# Altium PCB OFS_2027.PcbDoc
Units mil, origin at the board's own origin, x right, y up, seen from the top; angles counter-clockwise.
Board outline 6000 x 4000 mil, 2 copper layers (Top Layer, Bottom Layer); 65 components, 44 nets, 276 pads, 32 vias.
Unrouted connection lines stored in the file: 95.
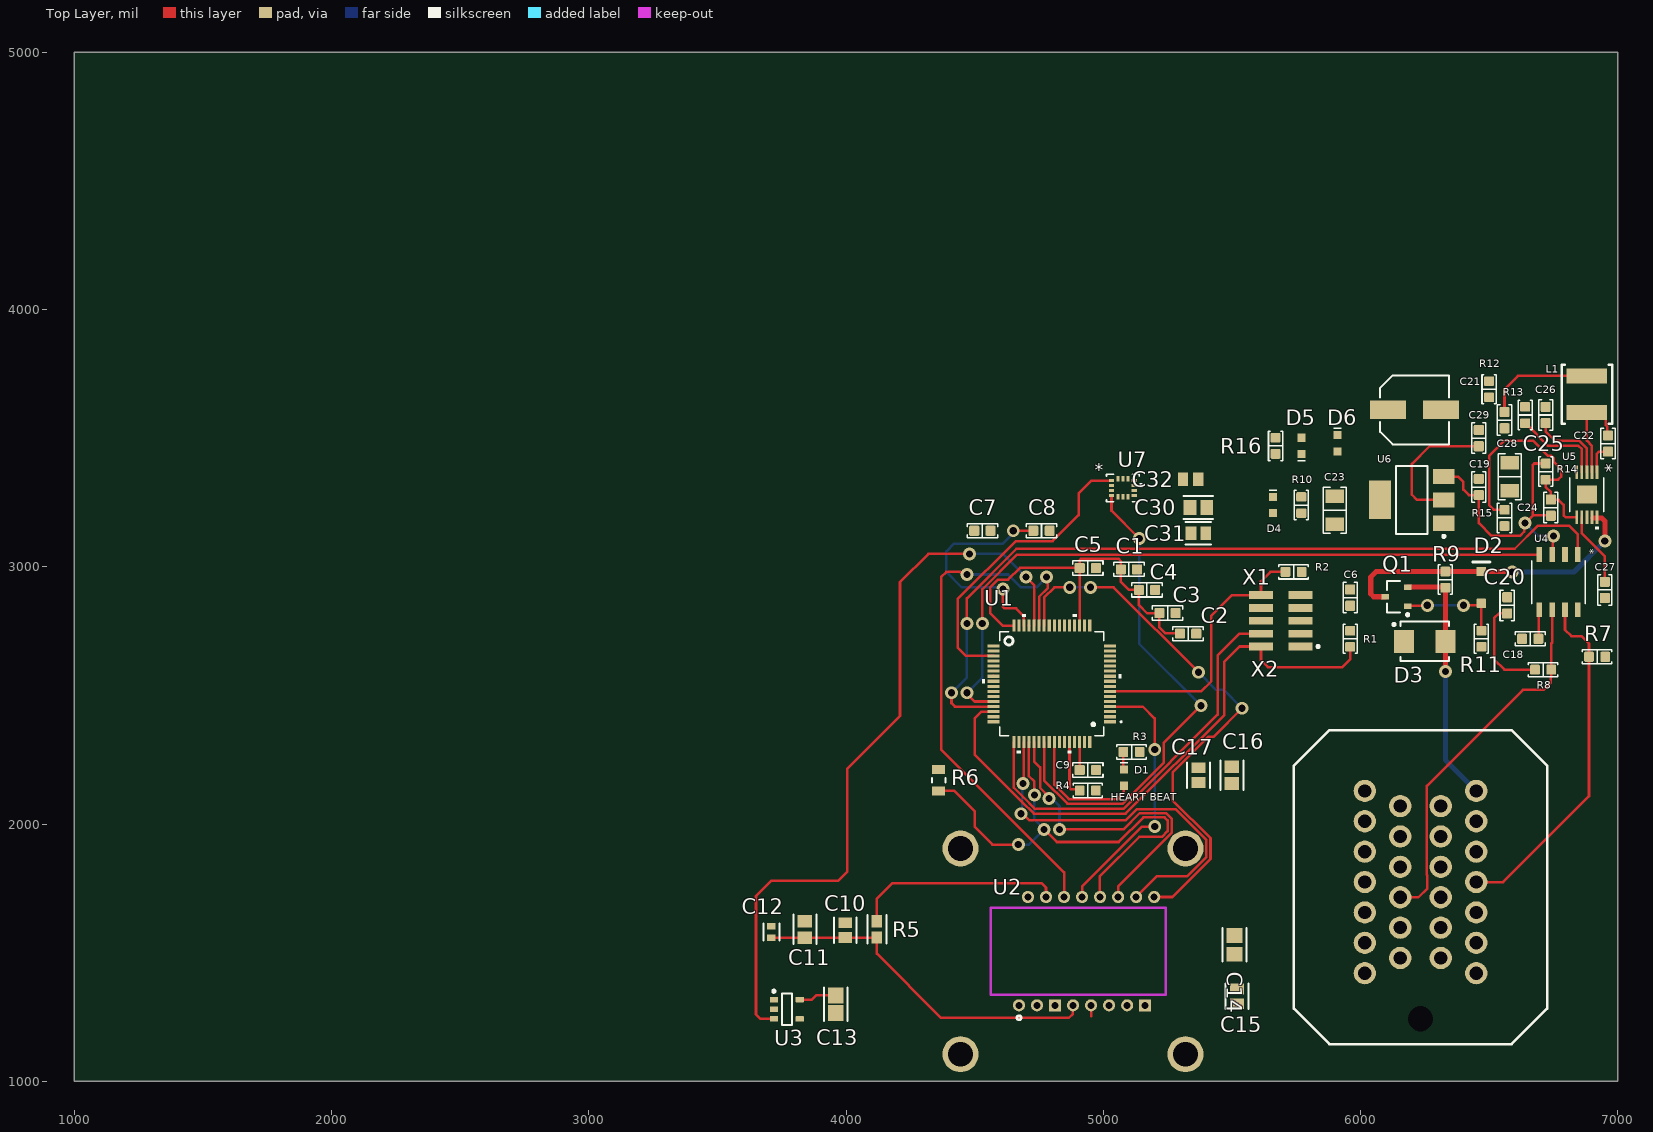
[diagram p0: Top Layer view]
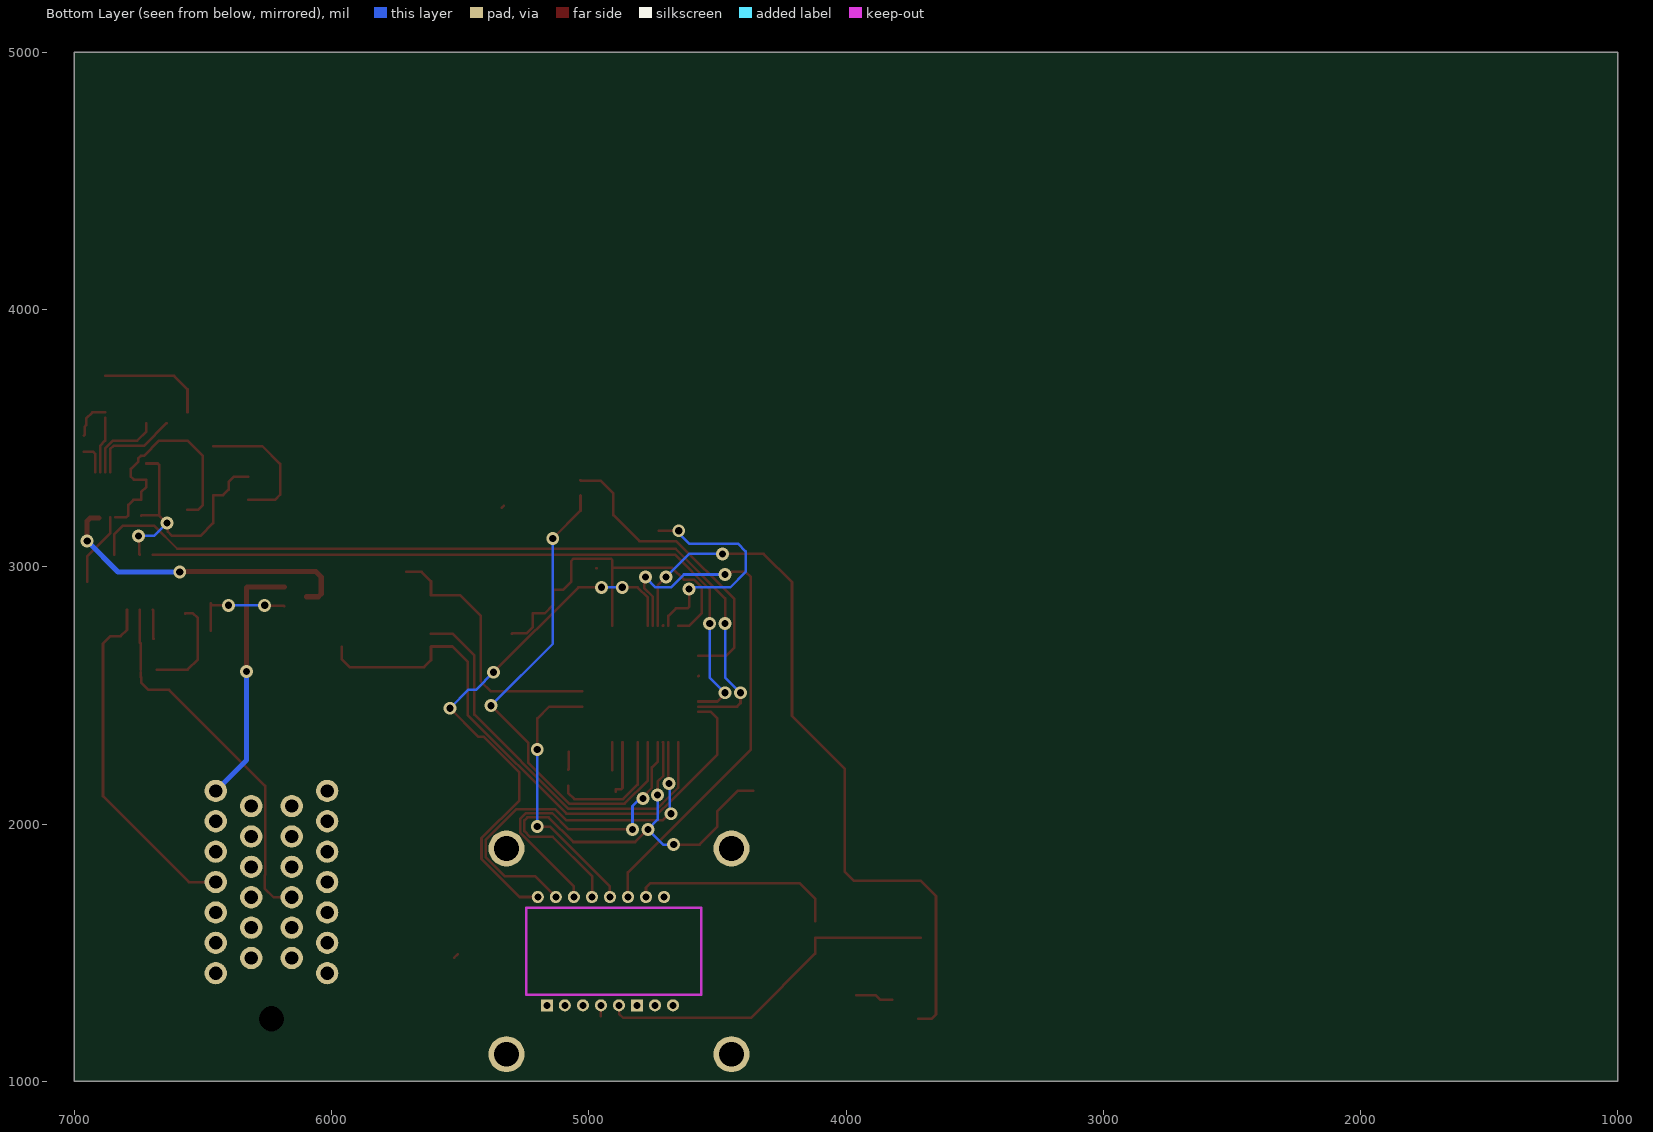
[diagram p1: Bottom Layer view, seen from below]
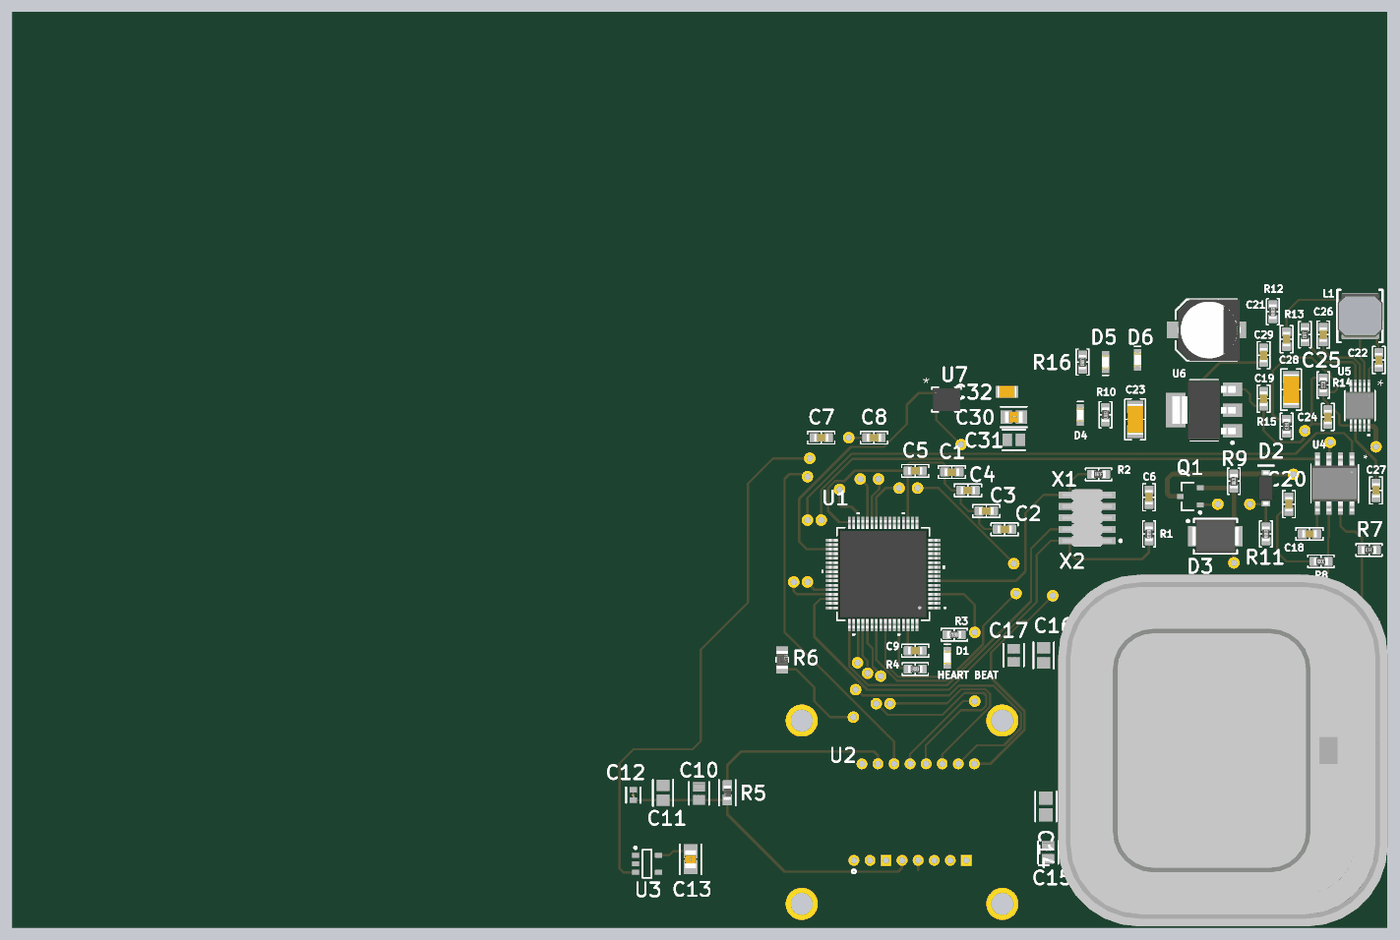
[diagram p2: 3D render of the assembled board from above, using the file's embedded part models]

## Layer stack, top to bottom
Top Solder: solder mask 0.4, Solder Resist, Dk 3.5
Top Layer: signal copper 1.4
Dielectric 1: dielectric 12.6, FR-4, Dk 4.8
Bottom Layer: signal copper 1.4
Bottom Solder: solder mask 0.4, Solder Resist, Dk 3.5

## Board outline
1000,1000 7000,1000 7000,5000 1000,5000

## Design rules (kind name [scope] priority, off if disabled: settings)
Clearance [All] p1: gap=6 ignorepadtopadclearanceinfootprint=FALSE
PolygonConnect [All] p1: connectstyle=Relief reliefconductorwidth=10 reliefentries=4 polygonreliefangle="90 Angle" airgapwidth=10
RoutingVias [All] p1: holewidth=28 width=50 viastyle="Through Hole" minholewidth=28 minwidth=50 maxholewidth=28 maxwidth=50
SolderMaskExpansion [All] p1: expansion=0 istentingtop=FALSE
SupplyNets "Schematic Supply Nets_5" [InNet('3V3')] p1: voltage=0.000
SupplyNets "Schematic Supply Nets_4" [InNet('5V')] p2: voltage=0.000
SupplyNets "Schematic Supply Nets_3" [InNet('GND')] p3: voltage=0.000
SupplyNets "Schematic Supply Nets_1" [InNet('24V')] p4: voltage=0.000
SupplyNets "Schematic Supply Nets" [InNet('+1.9V')] p5: voltage=0.000
Width POWER [InNetClass('POWER')] p1: maxlimit=20 minlimit=20 preferedwidth=20 minimp=50.000000 maximp=50.000000 favimp=50.000000
30 further rules are at their usual default settings.

## Classes and differential pairs
net class POWER: 24V NetD3_2
component class U_POWER: C21 C22 C23 C24 C25 C26 C27 C28 C29 D2 D3 D4 D5 D6 L1 Q1 R9 R10 R11 R12 R13 R14 R15 R16 U5 U6
component class U_OFS: C10 C11 C12 C13 C14 C15 C16 C17 R5 R6 U2 U3
component class U_MCU: C1 C2 C3 C4 C5 C6 C7 C8 C9 D1 R1 R2 R3 R4 U1 X1
component class U_IMU: C30 C31 C32 U7
component class U_CONNECTOR: X2
component class U_CAN_TRANSCEIVER: C18 C19 C20 R7 R8 U4

## Components (designator, comment, footprint, x,y, rotation, side; value= is the part's Value field where it differs from the comment)
C1 "Capacitor" 0603_CAP 5100,2990 r0 top value=4.7u
C2 "Capacitor" 0603_CAP 5330,2740 r0 top value=100n
C3 "Capacitor" 0603_CAP 5250,2820 r0 top value=100n
C4 "Capacitor" 0603_CAP 5170,2910 r0 top value=100n
C5 "Capacitor" 0603_CAP 4940,2995 r0 top value=100n
C6 "Capacitor" 0603_CAP 5960,2880 r90 top value=100n
C7 "Capacitor" 0603_CAP 4530,3140 r180 top value=100n
C8 "Capacitor" 0603_CAP 4760,3140 r0 top value=2.2u
C9 "Capacitor" 0603_CAP 4940,2210 r0 top value=2.2u
C10 "100nF" FP-CL21-IPC_C 3996.78,1587.33 r90 top
C11 "10uF" FP-CL21-IPC_B 3840,1590 r90 top
C12 "1uF" FP-CL10B105KO8NNNC-MFG 3710,1580 r90 top
C13 "33uF" FP-C2012-125-0_2-IPC_A 3960,1300 r270 top
C14 "4.7uF" FP-CL21-IPC_A 5510,1530 r90 top
C15 "100nF" FP-CL21-IPC_C 5520,1330 r90 top
C16 "10uF" FP-CL21-IPC_B 5500,2190 r90 top
C17 "100nF" FP-CL21-IPC_C 5370,2190 r90 top
C18 "Capacitor" 0603_CAP 6660,2720 r0 top value=100n
C19 "Capacitor" 0603_CAP 6460,3310 r270 top value=100n
C20 "Capacitor" 0603_CAP 6570,2850 r90 top value=4.7n
C21 "865080545012" 6.60x6.60x8.00mm_E_CAP 6210,3610 r0 top
C22 "Capacitor" 0603_CAP 6962.23,3478.89 r270 top value=100n
C23 "Capacitor" 1206_CAP 5900,3220 r90 top value=4.7u
C24 "Capacitor" 0603_CAP 6740,3230 r270 top value=10p
C25 "Capacitor" 1206_CAP 6580,3350 r90 top value=22u
C26 "Capacitor" 0603_CAP 6720,3590 r270 top value=1u
C27 "Capacitor" 0603_CAP 6950,2910 r90 top value=10n
C28 "Capacitor" 0603_CAP 6560,3570 r90 top value=10u
C29 "Capacitor" 0603_CAP 6460,3500 r270 top value=22u
C30 "GRM21BD72A225ME01K" FP-GRM21B-0_2-e0_2_0_7-IPC_B 5370,3230 r0 top
C31 "CL21B104KBCNNNC" FP-CL21-IPC_C 5370,3130 r0 top
C32 "CL21B103KBANNNC" CAPC2013X75X45LL10T25 5340,3340 r180 top
D1 "0603_LED" 0603_LED 5080,2180 r270 top
D2 "MMSZ5231B-7-F" SOD-123 6470,2920 r270 top
D3 "SMBJ26CA" SMBJ26CA 6250,2710 r0 top
D4 "0603_LED" 0603_LED 5660,3240 r270 top
D5 "0603_LED" 0603_LED 5770,3470 r90 top
D6 "0603_LED" 0603_LED 5910,3480 r270 top
L1 "SRN5040-150M" SRN5040-150M 6993.94,3548.88 r90 top
Q1 "SSM3J351R,LF" SSM3J351R,LF 6140,2883.4 r180 top
R1 "Resistor" 0603_RES 5960,2720 r270 top value=10k
R2 "Resistor" 0603_RES 5740,2980 r0 top value=10k
R3 "Resistor" 0603_RES 5110,2280 r180 top value=1k
R4 "Resistor" 0603_RES 4940,2130 r180 top value=10k
R5 "5.6Ω" FP-RMCF0603-IPC_A 4120,1590 r270 top
R6 "10K" FP-RMCF0805-MFG 4360,2170 r90 top
R7 "Resistor" 0603_RES 6920,2650 r180 top value=62
R8 "Resistor" 0603_RES 6710,2600 r180 top value=62
R9 "Resistor" 0603_RES 6330,2950 r90 top value=DNP
R10 "Resistor" 0603_RES 5770,3240 r90 top value=22k
R11 "Resistor" 0603_RES 6470,2720 r90 top value=1M
R12 "Resistor" 0603_RES 6500,3690 r90 top value=4.7k
R13 "Resistor" 0603_RES 6640,3590 r270 top value=86.6k
R14 "Resistor" 0603_RES 6720,3370 r270 top value=1M
R15 "Resistor" 0603_RES 6560,3190 r270 top value=123k
R16 "Resistor" 0603_RES 5670,3470 r90 top value=2.2k
U1 "STM32H573RIT6" LQFP64-10x10mm_STM 4800,2545 r180 top
U2 "PAW3395DM-T6QU" PAW3395DM-T6QU 4917.45,1505 r90 top
U3 "TLV70019DDCR" DDC0005A_L 3770,1280 r0 top
U4 "TCAN1057AVDRQ1" SOIC8_D_TEX 6770,2940 r270 top
U5 "LT8609AHMSE#TRPBF" 05-08-1664_ADI 6880,3280 r270 top
U6 "AZ1117CH-3.3TRG1" SOT-233-4 6200,3260 r180 top
U7 "ICM-42688-P" LGA14_2P5X3X0P91_TDK 5076.64,3306.45 r0 top
X1 "20021121-00010C4LF" HDR2X5_SMT 5690,2790 r90 top
X2 "Superseal 26 Pin Straight" SUPERSEAL-26Pin-STR 6233.46,1774.33 r90 top

## Footprints (in the part's own frame and the unit in brackets; to place one, negate y for a bottom-side part, rotate by r counter-clockwise, add the part's x,y. Pads: shape width x height; smd on the part's side, far side on the other; paste and mask are expansions set on the pad)
05-08-1664_ADI [mil]
  rect 52.5x11 smd paste+0 mask+0: 1(-87.25,39.37) 2(-87.25,19.69) 3(-87.25,0) 4(-87.25,-19.69) 5(-87.25,-39.37) 6(87.25,-39.37) 7(87.25,-19.69) 8(87.25,0) 9(87.25,19.69) 10(87.25,39.37)
  rect 70x78 smd paste+0 mask+0: 11(0,0)
  silkscreen extent -66,-66 134,66, body extent -99,-61 99,61, height 43
6.60x6.60x8.00mm_E_CAP [mm] "Aluminum Electrolytic Capacitor, Body 6.60x6.60x8.00mm, IPC Low Density"
  rect 3.55x1.85 smd: 1(-2.625,0) 2(2.625,0)
  silkscreen extent -3.4,-3.4 3.4,3.4, body extent -3.2,-3.4 3.8,3.4, height 8
0603_CAP [mm]
  rrect25% 1x1 smd: 1(-0.8,0) 2(0.8,0)
  silkscreen extent -1.5,-0.7 1.5,0.7, body extent -0.8,-0.41 0.8,0.41, height 0.82
0603_LED [mm] "SMD Mono-color Chip LED, body 1.60 x 0.80 mm"
  rect 0.8x0.8 smd: 1(-0.8,0) 2(0.8,0)
  silkscreen extent -1.55,-0.4 -1.4,0.4, body extent -0.8,-0.4 0.8,0.4, height 0.7
0603_RES [mm] "Chip Resistor, 2-Leads, Body 1.60x0.80mm, IPC Medium Density"
  rrect25% 0.95x1 smd: 1(-0.8,0) 2(0.8,0)
  silkscreen extent -1.45,-0.7 1.45,0.7, body extent -0.8,-0.4 0.8,0.4, height 0.45
1206_CAP [mm]
  rect 1.35x1.8 smd: 1(-1.375,0) 2(1.375,0)
  silkscreen extent -2.27,-1.12 2.27,1.15, body extent -1.7,-0.87 1.7,0.87, height 0.95
CAPC2013X75X45LL10T25 [mm] "Chip Capacitor, 2-Leads, Body 2.1x1.35mm, IPC High Density"
  rect 1x1.3 smd: 1(-0.75,0) 2(0.75,0)
  body extent -1.05,-0.67 1.05,0.67, height 0.75
DDC0005A_L [mm] "SOT23, 5-Leads, Body 3.05x1.75mm, Pitch 0.95mm, IPC High Density"
  rrect18% 0.8x0.55 smd: 1(-1.275,0.95) 2(-1.275,0) 3(-1.275,-0.95) 4(1.275,-0.95) 5(1.275,0.95)
  silkscreen extent -1.4,-1.55 0.5,1.9, body extent -0.88,-1.52 0.87,1.53, height 1.1
FP-C2012-125-0_2-IPC_A [mil]
  rect 62.13x61.27 smd paste+0 mask+0: 1(-34.02,0) 2(34.02,0)
  silkscreen extent -65,-46 65,46, body extent -85,-50 85,50, height 10
FP-CL10B105KO8NNNC-MFG [mm]
  rect 0.625x0.825 smd paste+0 mask+0: 1(-0.575,0) 2(0.575,0)
  silkscreen extent -0.85,-0.8 0.85,0.8, body extent -0.99,-0.55 0.99,0.55, height 0.25
FP-CL21-IPC_A [mil]
  rect 57.27x61.27 smd paste+0 mask+0: 1(-36.45,0) 2(36.45,0)
  silkscreen extent -65,-46 65,46, body extent -85,-50 85,50, height 10
FP-CL21-IPC_B [mil]
  rect 49.4x57.33 smd paste+0 mask+0: 1(-32.51,0) 2(32.51,0)
  silkscreen extent -57,-44 57,44, body extent -67,-39 67,39, height 10
FP-CL21-IPC_C [mil]
  rect 41.52x53.39 smd paste+0 mask+0: 1(-28.57,0) 2(28.57,0)
  silkscreen extent -49,-44 49,44, body extent -53,-32 53,32, height 10
FP-GRM21B-0_2-e0_2_0_7-IPC_B [mil]
  rect 49.4x57.33 smd paste+0 mask+0: 1(-32.51,0) 2(32.51,0)
  silkscreen extent -57,-44 57,44, body extent -67,-39 67,39, height 10
FP-RMCF0603-IPC_A [mil]
  rect 47.48x41.66 smd paste+0 mask+0: 1(-31.54,0) 2(31.54,0)
  silkscreen extent -55,-37 55,37, body extent -75,-41 75,41, height 10
FP-RMCF0805-MFG [mm]
  rect 0.9x1.3 smd paste+0 mask+0: 1(-1.05,0) 2(1.05,0)
  silkscreen extent -0.23,-0.67 0.23,0.67, body extent -1.6,-0.77 1.6,0.77, height 0.25
HDR2X5_SMT [mm] "Header, 10-Leads, Body 3.43x6.35mm, Pitch 1.27mm"
  rect 0.76x2.4 smd: 1(-2.54,-1.95) 2(-2.54,1.95) 3(-1.27,-1.95) 4(-1.27,1.95) 5(0,-1.95) 6(0,1.95) 7(1.27,-1.95) 8(1.27,1.95) 9(2.54,-1.95) 10(2.54,1.95)
  silkscreen extent -2.66,-3.83 -2.42,-3.58, body extent -3.17,-2.75 3.18,2.75, height 4.5
LGA14_2P5X3X0P91_TDK [mil]
  rect 21x12 smd paste+0 mask+0: 1(-44.5,29.53) 2(-44.5,9.84) 3(-44.5,-9.84) 4(-44.5,-29.53) 8(44.5,-29.53) 9(44.5,-9.84) 10(44.5,9.84) 11(44.5,29.53)
  rect 12x21 smd paste+0 mask+0: 5(-19.69,-35) 6(0,-35) 7(19.68,-35) 12(19.68,35) 13(0,35) 14(-19.69,35)
  silkscreen extent -64,-54 75,54, body extent -59,-49 59,49, height 38
LQFP64-10x10mm_STM [mil]
  rect 47x12 smd paste+0 mask+0: 1(-226.38,147.64) 2(-226.38,127.95) 3(-226.38,108.27) 4(-226.38,88.58) 5(-226.38,68.9) 6(-226.38,49.21) 7(-226.38,29.53) 8(-226.38,9.84) 9(-226.38,-9.84) 10(-226.38,-29.53) 11(-226.38,-49.21) 12(-226.38,-68.9) 13(-226.38,-88.58) 14(-226.38,-108.27) 15(-226.38,-127.95) 16(-226.38,-147.64) 33(226.38,-147.64) 34(226.38,-127.95) 35(226.38,-108.27) 36(226.38,-88.58) 37(226.38,-68.9) 38(226.38,-49.21) 39(226.38,-29.53) 40(226.38,-9.84) 41(226.38,9.84) 42(226.38,29.53) 43(226.38,49.21) 44(226.38,68.9) 45(226.38,88.58) 46(226.38,108.27) 47(226.38,127.95) 48(226.38,147.64)
  rect 12x47 smd paste+0 mask+0: 17(-147.64,-226.38) 18(-127.95,-226.38) 19(-108.27,-226.38) 20(-88.58,-226.38) 21(-68.9,-226.38) 22(-49.21,-226.38) 23(-29.53,-226.38) 24(-9.84,-226.38) 25(9.84,-226.38) 26(29.53,-226.38) 27(49.21,-226.38) 28(68.9,-226.38) 29(88.58,-226.38) 30(108.27,-226.38) 31(127.95,-226.38) 32(147.64,-226.38) 49(147.64,226.38) 50(127.95,226.38) 51(108.27,226.38) 52(88.58,226.38) 53(68.9,226.38) 54(49.21,226.38) 55(29.53,226.38) 56(9.84,226.38) 57(-9.84,226.38) 58(-29.53,226.38) 59(-49.21,226.38) 60(-68.9,226.38) 61(-88.58,226.38) 62(-108.27,226.38) 63(-127.95,226.38) 64(-147.64,226.38)
  silkscreen extent -273,-270 270,270, body extent -236,-236 236,236, height 63
PAW3395DM-T6QU [mm] "PixArt PAW3395DM-T6QU optical navigation sensor, 16-pin molded lead-frame DIP, 1.78mm pitch staggered dual row, 10.7mm row spacing, through-hole"
  round 1.2 hole 0.7: 1(-5.334,6.223) 2(-5.334,4.443) 4(-5.334,0.883) 5(-5.334,-0.897) 6(-5.334,-2.677) 7(-5.334,-4.457) 9(5.366,-7.127) 10(5.366,-5.347) 11(5.366,-3.567) 12(5.366,-1.787) 13(5.366,-0.007) 14(5.366,1.773) 15(5.366,3.553) 16(5.366,5.333)
  rect 1.2x1.2 hole 0.7: 3(-5.334,2.663) 8(-5.334,-6.237)
  Keep-Out Layer lines w0.254: -4.284,9.003 -4.284,-8.257 4.316,-8.257 4.316,9.003 -4.284,9.003
  silkscreen extent -6.76,6.02 -6.36,6.42
SMBJ26CA [mm] "SODFL, 2-Leads, Body 3.62x5.40mm, IPC Medium Density"
  rect 1.95x2.25 smd: 1(-2.05,0) 2(2.05,0)
  silkscreen extent -3.17,-1.95 2.4,1.95, body extent -2.67,-1.81 2.67,1.81, height 2.65
SOD-123 [mm] "SODFL, 2-Leads, Body 1.55x3.70mm, IPC Medium Density"
  rrect15% 0.9x0.95 smd: 1(-1.575,0) 2(1.575,0)
  silkscreen extent -2.5,-0.85 -2.5,0.85, body extent -1.85,-0.85 1.85,0.85, height 1.35
SOIC8_D_TEX [mil]
  rect 57.5x22 smd paste+0 mask+0: 1(-107.25,75) 2(-107.25,25) 3(-107.25,-25) 4(-107.25,-75) 5(107.25,-75) 6(107.25,-25) 7(107.25,25) 8(107.25,75)
  silkscreen extent -84,-104 84,104, body extent -122,-99 122,99, height 69
SOT-233-4 [mm] "SOT223, 4-Leads, Body 6.50x7.00mm (avg), Pitch 2.30mm, IPC Medium Density"
  rect 2.15x1.5 smd: 1(-3.15,2.3) 2(-3.15,0) 3(-3.15,-2.3)
  rect 2.15x3.8 smd: 4(3.15,0)
  silkscreen extent -3.27,-3.35 1.55,3.72, body extent -3.5,-3.35 3.5,3.35, height 1.8
SRN5040-150M [mm]
  rect 1.5x4 smd: 1(1.3,2.894) 2(4.9,2.894)
  silkscreen extent 0.2,0.39 6,5.39, body extent 0.6,0.35 5.6,5.37, height 3.5
SSM3J351R,LF [mm]
  rect 0.75x0.55 smd: 1(-1.1,0.95) 2(-1.1,-0.95) 3(1.1,0)
  silkscreen extent -1.23,-1.55 0.95,1.9, body extent -0.95,-1.55 0.95,1.55, height 0.81
SUPERSEAL-26Pin-STR [mm]
  round 2.2 hole 1.3: 1(9,-5.5) 2(6,-5.5) 3(3,-5.5) 4(0,-5.5) 5(-3,-5.5) 6(-6,-5.5) 7(-9,-5.5) 8(7.5,-2) 9(4.5,-2) 10(1.5,-2) 11(-1.5,-2) 12(-4.5,-2) 13(-7.5,-2) 14(7.5,2) 15(4.5,2) 16(1.5,2) 17(-1.5,2) 18(-4.5,2) 19(-7.5,2) 20(9,5.5) 21(6,5.5) 22(3,5.5) 23(0,5.5) 24(-3,5.5) 25(-6,5.5) 26(-9,5.5)
  round 0 hole 2.5: 27(-13.5,0)
  silkscreen extent -16,-12.5 15,12.5, body extent -19.5,-19.5 19.5,17, height 24.71

## Part data
C1 C2 C3 C4 C5 C6 C7 C8 C9 C18 C19 C20 C24 C25 C26 C27 C28 C29: Voltage=25V
C10 C15 C17: library part CMP-2000-05017-2, "CL21 Series 0805 100nF 50V ±10% Tolerance X7R Multilayer Ceramic Chip Capacitor", Case Code (Imperial)=0805, Case Code (Metric)=2012, Dielectric=X7R, Max Operating Temperature=125°C, Min Operating Temperature=-55°C, Tolerance=10%, Voltage=50V, Capacitance=100nF, Case/Package=0805, Contact Plating=Tin, Depth=1.25mm, Height=0.85mm, Lead Free="Lead Free", Length=2mm, Material=Ceramic, Mount="Surface Mount", Packaging="Tape and Reel", Radiation Hardening=No, Thickness=0.037inch, Voltage Rating=50V, Voltage Rating (DC)=50V, Width=0.049inch
C11 C16: library part CMP-13271-001796-1, "CL21 Series 0805 10uF 10V ±10% Tolerance X5R Multilayer Ceramic Chip Capacitor", Case Code (Imperial)=0805, Case Code (Metric)=2012, Dielectric=X5R, Max Operating Temperature=85°C, Min Operating Temperature=-55°C, Package Quantity=3000, Tolerance=10%, Voltage=10V, Capacitance=10uF, Case/Package=0805, Depth=1.25mm, Height=1.25mm, Lead Free="Lead Free", Length=2mm, Mount="Surface Mount", Packaging="Tape and Reel", Radiation Hardening=No, Termination=Wraparound, Thickness=0.053inch, Voltage Rating=10V, Width=0.049inch
C12: library part CMP-2000-06093-2, "CAP CER 1UF 16V X7R 0603", MANUFACTURER="Samsung Electro-Mechanics America, Inc", Manufacturer Part Number=CL10B105KO8NNNC, Temperature="-55°C to +125°C", Temperature Characteristic=X7R, Temperature Coefficient=15%, Temperature Range High=+125°C, Temperature Range Low=-55°C, Tolerance=10%, Voltage Rating=16V, Automotive=No, Capacitance=1uF, Category=Cap, ComponentLink2Description=Datasheet, ComponentLink2URL=http://www.samsungsem.com/global/front/downloadcms.do?path=%2F%2Fglobal%2F%2Fsupport%2F%2Fproduct-search%2F%2Fmlcc%2F%2F__icsFiles%2F%2Fafieldfile%2F%2F2019%2F%2F06%2F%2F18&fileName=CL10B105KO8NNNC-19.pdf, Device Class L1="Passive Components", Device Class L2=Capacitors, Device Class L3="Ceramic Capacitors", Digikey Description="CAP CER 1UF 16V X7R 0603", Height=0.9mm, Ipc Land Pattern Name=CAPC16080X80, Lead Free=Yes, Material=Ceramic, Octopart=https://octopart.com/cl10b105ko8nnnc-samsung-19018973, Package=CL10B105KO8NNNC, RoHS=TRUE
C13: library part CMP-08246-003796-1, "Multilayer Ceramic Capacitors 33μF ±20% 6.3V X5R SMD 0805", Case Code (Imperial)=0805, Case Code (Metric)=2012, Dielectric=X5R, Dielectric Material=Ceramic, Max Operating Temperature=85°C, Min Operating Temperature=-55°C, Package Quantity=1, Tolerance=20%, Voltage Rating=6.3V, Capacitance=33uF, Case/Package=0805, Construction=Flat, Depth=1.25mm, Height=1.25mm, Lead Free="Lead Free", Length=2mm, Mount="Surface Mount", Packaging="Tape and Reel", Radiation Hardening=No, REACH SVHC="No SVHC", Resistor Type=Ceramic, RoHS Compliant=Yes, Series=C, Termination=SMD/SMT, Thickness=0.057inch, Voltage Rating (DC)=6.3V, Weight=0.000194oz, Width=1.2mm
C14: library part CMP-13271-002624-1, "CL21 Series 0805 4.7uF 25V ±10% Tolerance X5R Multilayer Ceramic Chip Capacitor", Case Code (Imperial)=0805, Case Code (Metric)=2012, Dielectric=X5R, Max Operating Temperature=85°C, Min Operating Temperature=-55°C, Package Quantity=1, Tolerance=10%, Voltage Rating=25V, Capacitance=4.7uF, Case/Package=0805, Depth=1.25mm, Height=1.25mm, Lead Free="Lead Free", Length=2mm, Mount="Surface Mount", Packaging="Tape and Reel", Radiation Hardening=No, Thickness=0.055inch, Voltage Rating (DC)=25V, Width=0.049inch
C21: "CAP ALUM 100UF 20% 35V SMD", Voltage=35V, ComponentLink1Description=Digikey, ComponentLink1URL=https://www.digikey.com/en/products/detail/würth-elektronik/865080545012/5728106, Vaule=100u
C22: Voltage=16V
C23: Voltage=50V
C30: library part CMP-06035-063309-1, "CAP CER 2.2UF 100V X7T 0805"
C31: library part CMP-2000-05017-2, "CL21 Series 0805 100nF 50V ±10% Tolerance X7R Multilayer Ceramic Chip Capacitor", Capacitance=100nF, Case Code (Imperial)=0805, Case Code (Metric)=2012, Dielectric=X7R, Max Operating Temperature=125°C, Min Operating Temperature=-55°C, Tolerance=10%, Voltage=50V, Case/Package=0805, Contact Plating=Tin, Depth=1.25mm, Height=0.85mm, Lead Free="Lead Free", Length=2mm, Material=Ceramic, Mount="Surface Mount", Packaging="Tape and Reel", Radiation Hardening=No, Thickness=0.037inch, Voltage Rating=50V, Voltage Rating (DC)=50V, Width=0.049inch
C32: library part CMP-2000-06105-1, "Multilayer Ceramic Capacitor, 10 nF, 50 V, -55 to 125 degC, 2-Pin SMD, RoHS, Tape and Reel", Capacitance=10000pF, Case Size/Dimension=0805, Dielectric=X7R, MANUFACTURER="Samsung Electro-Mechanics", Package Description="2-Pin Surface Mount Device, Body 2 x 1.25 mm", Rated Voltage=50V, Tolerance (%)=±10%, Datasheet URL=https://datasheet.ciiva.com/29199/455082-da-01-en-vs-kondensator-0805-29199459.pdf, Datasheet Version=11/2010, Manufacturer URL=http://www.samsungsem.com/global/index.jsp, Mounting Technology=SurfaceMount, Package Reference=0805
D1 D4 D5 D6: "WL-SMCW Mono-color Chip LED Waterclear, SMT, size 0603, Blue, 3.2V, 140°", Case/Size Code=0603, Emitting Color=Blue, Forward Voltage=3.2V, MANUFACTURER="Wurth Elektronik", Manufacturer Part Number=150060BS75000, Operating Temperature Max=85°C, Operating Temperature Min=-40°C, Category="Signal LEDs", Chip Technology=InGaN, ComponentLink1Description="Website Link", ComponentLink1URL=https://www.we-online.com/redexpert/article/150060BS75000?ad, ComponentLink2Description="Datasheet Link", ComponentLink2URL=https://www.we-online.com/redexpert/spec/150060BS75000?ad, Dominant Wavelength=470nm, Height=0.7mm, Length=1.6mm, Luminous Intensity=145mcd, Match Code=WL-SMCW, Mount="Surface Mount", Packaging="Tape and Reel", Peak Wavelength=465nm, Viewing Angle=140°, Width=0.8mm
D2: "Zener Diode 5.1V 500mW ±5% Surface Mount SOD-123", Package=SOD-123, ComponentLink1Description=Digikey, ComponentLink1URL=https://www.digikey.com/en/products/detail/diodes-incorporated/MMSZ5231B-7-F/755472, Num_Circuits=1
D3: "42.1V Clamp 14.3A Ipp Tvs Diode Surface Mount DO-214AA (SMBJ)", ComponentLink1Description=Digikey, ComponentLink1URL=https://www.digikey.com/en/products/detail/littelfuse-inc/SMBJ26CA/286000
L1: "FIXED IND 15UH 1.8A 96 MOHM SMD"
Q1: "MOSFET P-CH 60V 3.5A SOT-23F"
R5: library part CMP-26527-007122-1, "5.6Ω ±1% 0.1W 0603 Thick Film Chip Resistor AEC-Q200 compliant", Case Code (Imperial)=0603, Case Code (Metric)=1608, Max Operating Temperature=155°C, Max Power Dissipation=100mW, Min Operating Temperature=-55°C, Resistance=5.6R, Resistor Type="Thick Film", Temperature Coefficient=200ppm/°C, Tolerance=1%, Case/Package=0603, Contact Plating=Tin, Features="Automotive AEC-Q200", Height=0.022inch, Length=0.061inch, Mount="Surface Mount", Number of Terminations=2, Packaging="Tape and Reel", Radiation Hardening=No, RoHS Compliant=Yes, Series=RMCF, Width=0.031inch
R6: library part CMP-26527-000121-1, "RES 10K OHM 1% 1/8W 0805", Case Code (Imperial)=0805, Case Code (Metric)=2012, Max Operating Temperature=155°C, Max Power Dissipation=125mW, Min Operating Temperature=-55°C, Resistance=10kR, Resistor Type="Thick Film", Temperature Coefficient=100ppm/°C, Tolerance=1%, Case/Package=0805, Construction=Rectangular, Contact Plating=Tin, Depth=1.25mm, Features="Automotive AEC-Q200", Height=0.026inch, Lead Free="Lead Free", Length=2mm, Military Standard=Not, Mount="Surface Mount", Number of Terminations=2, Packaging="Tape and Reel", Power Rating=125mW, Radiation Hardening=No, RoHS Compliant=Yes, Series=RMCF, Size Code=0805, Width=0.049inch
U1: Mfr_Name=STMicroelectronics, RefDes=RefDes, Type=Type
U2: "PixArt PAW3395DM-T6QU optical navigation sensor, 16-pin molded lead-frame DIP, 1.78mm pitch staggered dual row, 10.7mm row spacing, through-hole"
U3: library part CMP-0394-01054-2, "Single Output LDO, 200 mA, Fixed 1.9 V Output, 2 to 5.5 V Input, with Low IQ, 5-pin SOT (DDC), -40 to 125 degC, Green (RoHS & no Sb/Br)", MANUFACTURER="Texas Instruments", Accuracy(%)=2, Code_JEDEC=MO-193, ComponentLink1Description="Manufacturer URL", ComponentLink1URL=http://www.ti.com/, ComponentLink2Description=Datasheet, ComponentLink2URL=http://www.ti.com/general/docs/lit/getliterature.tsp?genericPartNumber=TLV70019&fileType=pdf, ComponentLink3Description="Package Specification", ComponentLink3URL=http://www.ti.com/litv/pdf/mpds123d, DatasheetVersion=SLVSA00D, Eco-Plan="Green (RoHS & no Sb/Br)", Fixed Output Options(V)=1.9, Iout(Max)(A)=0.2, Iq(Typ)(mA)=0.03, Mounting Technology="Surface Mount", PackageDescription="5-Pin Plastic Small Outline, Body 2.9 x 1.6 mm, 0.95 mm Pitch", PackageReference=DDC0005A, PackageVersion=4204403-2/E, PartNumber=TLV70019DDCR, SubFamily="Single Channel LDO", Vdo(Typ)(mV)=175, Vin(Max)(V)=5.5, Vin(Min)(V)=2, Vout Adj(Max)(V)=1.9, Vout Adj(Min)(V)=1.9
U4: "CAN transceiver with silent mode 8-SOIC Bus Protected", Manufacturer_Name="Texas Instruments", ComponentLink1Description=Datasheet, ComponentLink1URL=https://www.ti.com/lit/ds/symlink/tcan1057a-q1.pdf, Copyright="Copyright (C) 2025 Ultra Librarian. All rights reserved.", Manufacturer_Part_Number=TCAN1057AVDRQ1, RefDes=RefDes, Type=Interface
U5: library part LT8609AHMSETRPBF, "Buck Switching Regulator IC Positive Adjustable 0.782V 1 Output 3A 10-TFSOP, 10-MSOP (0.118\", 3.00mm Width) Exposed Pad", Manufacturer_Name="Analog Devices Inc", Copyright="Copyright (C) 2025 Ultra Librarian. All rights reserved.", Manufacturer_Part_Number=LT8609AHMSE#TRPBF, RefDes=RefDes, Type="Power Management"
U6: "No Description Available", Manufacturer_Name="Diodes Inc", Copyright="Copyright (C) 2025 Ultra Librarian. All rights reserved.", Manufacturer_Part_Number=AZ1117CH-3.3TRG1, RefDes=RefDes, Type=Type
U7: "Description", Manufacturer_Name=TDK, Copyright="Copyright (C) 2025 Ultra Librarian. All rights reserved.", Manufacturer_Part_Number=ICM-42688-P, RefDes=RefDes, Type="Motion Sensors"
X1: "Header, 10-Leads, Body 3.43x6.35mm, Pitch 1.27mm", Circuits=10, ComponentLink1Description=Digikey, ComponentLink1URL=https://www.digikey.com/product-detail/en/amphenol-icc-fci/20021121-00010C4LF/609-3695-1-ND/2209147, Name=20021121-00010C4LF
X2: library part 6437288-6, "Connector Header Through Hole 26 position 0.118\" (3.00mm)"

## Free pads (board coordinates)
  round 140 hole 96: 2(4445,1105) 3(4445,1905) 4(5320,1905) 5(5320,1105)

## Via types
v1: diameter 50, hole 28, Top Layer to Bottom Layer, 32 vias

## Nets (pads, with @x,y where several pads share a name; then routed paths per layer and width w, separated by ;. In a path a pad name is that pad's centre, name@x,y a point inside that pad or via, vN(x,y) a via of type N, cw(c..) or ccw(c..) an arc to the next point about the centre after c; other vN are vias at no path point)
3V3: C1.1 C2.1 C3.1 C4.1 C5.1 C6.1 C7.1 C16.1 C17.1 C18.2 C29.2 C30.1 C31.1 C32.2 R1.1 R2.2 R6.2 R16.2 U1.13 U1.19 U1.32 U1.48 U1.64 U2.7 U3.1 U4.5 U6.2 U6.4 U7.5 U7.8 X1.1 | length 2136.9
  Top Layer w10: U1.32 4608.62,2771.38 4560,2820 4560,2920 4590,2950 4630,2950 4675.75,2995.75 C5.1@4907.76,2995.75 ; U1.19 C5.1@4908.27,2995 ; C5.1 4908.5,3025.39 4914.36,3031.25 5058.75,3031.25 5068.5,3021.5 C1.1 5068.5,2941.5 5100,2910 C4.1 5138.5,2851.5 5170.75,2819.25 C3.1@5217.76,2819.25 ; C3.1 5218.5,2764.12 5241.31,2741.31 5297.19,2741.31 C2.1 ; C30.1@5330.47,3237.02 C30.1 ; U6.2 6220,3260 6200,3280 6200,3400 6268.5,3468.5 C29.2 ; C18.2 6693.25,2721.75 6693.25,2831 U4.5
3V_LED: D6.2 R16.1
5V: C19.2 C24.2 C25.2 C28.2 L1.2 R12.2 R14.1 U4.3 U6.3 | length 1527.5
  Top Layer w10: U6.3 6379.45,3350.55 6400,3330 6400,3300 6421.5,3278.5 C19.2 6460,3170 6510,3120 6620,3120 6636.72,3136.72 6636.72,3166.72 v1(6640,3170) 6670,3200 ; C28.2 6560,3690 6611.79,3741.79 L1.2 ; R14.1 6675.86,3401.5 6670,3395.64 6670,3200 ; C24.2 6738.5,3200 6670,3200 ; U4.3 6747.5,3049.75 6747.5,3117.5 v1(6750,3120)
  Bottom Layer w10: v1(6640,3170) 6690,3120 v1(6750,3120)
5V_LED: D5.2 R12.1
24V: C21.1 C23.2 D2.1 Q1.3 R9.2 R10.2 U5.9 U5.10 | length 1225.1
  Top Layer w20: Q1.3 6051.72,2883.4 6040,2895.11 6040,2960 6061.5,2981.5 R9.2 6330.26,2981.75 6469.74,2981.75 D2.1 6471,2981 6589,2981 v1(6590,2980) ; U5.9@6904.09,3190 6938.28,3190 6950,3178.28 v1(6950,3100)
  Bottom Layer w20: v1(6590,2980) 6830,2980 v1(6950,3100)
24V_LED: D4.2 R10.1
+1.9V: C10.1 C11.1 C12.1 C13.1 R5.2 U2.4 U3.5 | length 1525.1
  Top Layer w10: C12.1 3839.87,1557.36 C11.1 3996.1,1557.49 3997.08,1558.46 R5.2 4120,1496 4370,1246 4866,1246 4882.24,1262.24 4882.24,1294.55 U2.4 ; U3.5 3867.4,1317.4 3884.02,1334.02 C13.1
BOOT0: R4.2 U1.60 | length 216.4
  Top Layer w10: U1.60 4868.9,2140.65 4874.76,2134.79 4894.8,2134.79 R4.2@4894.8,2124.69
BST: C22.2 U5.1 | length 118.3
  Top Layer w10: U5.1 6919.37,3439.37 6927.39,3447.39 C22.2
Feedback: C24.1 R14.2 R15.1 U5.6 | length 948.1
  Top Layer w10: R15.1 6518.5,3221.5 6500,3240 6500,3430 6560,3490 6670,3490 6728.8,3431.2 6741.5,3431.2 6750.69,3422.01 6750.69,3409.31 6780,3380 6780,3350 6768.5,3338.5 R14.2 6720,3310 6740,3290 C24.1 6741.5,3260 6770,3260 6790,3240 6790,3200 6797.25,3192.75 U5.6
GND: C1.2 C2.2 C3.2 C4.2 C5.2 C6.2 C7.2 C8.2 C9.2 C10.2 C11.2 C12.2 C13.2 C14.2 C15.2 C16.2 C17.2 C18.1 C19.1 C20.2 C21.2 C23.1 C25.1 C26.1 C27.1 C28.1 C29.1 C30.2 C31.2 C32.1 D3.1 D4.1 D5.1 D6.1 R3.1 R4.1 R11.1 R13.1 R15.2 U1.12 U1.18 U1.31 U1.47 U1.63 U2.3 U2.8 U3.2 U4.2 U4.8 U5.11 U6.1 U7.6 U7.7 U7.11 X1.3 X1.5 X2.13 | length 2.1
  Top Layer w10: C5.2@4970,2993.5 C5.2
HB_LED: D1.1 R3.2 | length 69.1
  Top Layer w10: R3.2 5078.5,2212.99 D1.1
HEART_BEAT: D1.2 U1.57 | length 497.7
  Top Layer w10: U1.57 4809.84,2152.78 4866.31,2096.31 5056.31,2096.31 5080,2120 D1.2
INTVCC: C26.2 U5.3 | length 313
  Top Layer w10: C26.2 6720,3525.25 6755.25,3490 6850,3490 6880,3460 U5.3
NetC14_1: C14.1 C15.1 U2.5 | length 61.4
  Top Layer w10: 4952.76,1252.76 U2.5 ; C14.1 C14.1@5523.55,1480
NetC22_1: C22.1 L1.1 U5.2 | length 371.7
  Top Layer w10: L1.1@6880,3578.27 6880,3490 6899.69,3470.32 U5.2 ; L1.1 6929.21,3600.06 6953.74,3575.53 6953.74,3550.4 6960,3544.14 6960,3512.61 C22.1
NetD3_2: D3.2 Q1.2 R9.1 X2.1 | length 987.5
  Top Layer w20: Q1.2 6327.71,2920.8 R9.1 6330,2710.71 D3.2 ; v1(6330,2593.4) D3.2@6330,2710
  Bottom Layer w20: v1(6330,2593.4) 6330,2248.66 X2.1
NetR5_1: R5.1 U2.15 | length 814.3
  Top Layer w10: R5.1 4120,1710 4180,1770 4760,1770 4777.57,1752.43 U2.15
NetR6_1: R6.1 U1.52 U2.12 | length 1925.1
  Top Layer w10: R6.1 4421.34,2128.66 4500,2050 4500,1989.59 4569.59,1920 v1(4670,1920) ; U1.52 4710.42,2317.62 4710.42,2186.31 4732.23,2164.51 v1(4732.23,2112.23) ; v1(4770,1979) 4771,1979 4820,1930 5060,1930 5156,2026 5238.14,2026 5250,2014.14 5250,1972.18 5227.82,1950 5140,1950 4986.31,1796.31 4986.31,1717.75 U2.12
  Bottom Layer w10: v1(4670,1920) 4711,1920 v1(4770,1979) 4732.23,2016.77 v1(4732.23,2112.23)
NetR7_2: R7.2 U4.7 X2.4 | length 1363.3
  Top Layer w10: X2.4 6554.33,1774.33 6888.5,2108.5 R7.2 6888.5,2701.5 6860,2730 6820,2730 6795,2755 U4.7
NetR8_1: R8.1 U4.6 X2.17 | length 1441.4
  Top Layer w10: X2.17 6225.28,1715.28 6260,1750 6260,1800 6257.9,1802.1 6257.9,2147.9 6631.5,2521.5 6711.5,2521.5 6740,2550 6740,2570 6741.17,2571.17 R8.1@6741.17,2589.68 ; R8.1 6741.5,2701.5 6745,2705 U4.6
NetU1_4: U1.4 U2.13 | length 1032.8
  Top Layer w10: U2.13 4917.72,1757.72 5150,1990 v1(5200,1990) ; U1.4 5153.58,2456.42 5200,2410 v1(5200,2290)
  Bottom Layer w10: v1(5200,1990) v1(5200,2290)
NetU1_26: U1.26 U2.9 | length 2139.8
  Top Layer w10: U1.26 4770.47,2880.47 4810,2920 v1(4870,2920) ; v1(4950,2920) 5040,2920 v1(5370,2590) ; U2.9 5268.44,1716.26 5417,1864.82 5417,1945.18 5270,2092.18 5270,2200 5409.86,2339.86 5429.86,2339.86 v1(5540,2450)
  Bottom Layer w10: v1(4870,2920) v1(4950,2920) ; v1(5370,2590) 5437.29,2522.71 5467.29,2522.71 v1(5540,2450)
NetU1_27: U1.27 U2.14 | length 2104.6
  Top Layer w10: v1(4470,2970) 4462.35,2977.65 4446.49,2977.65 4444.14,2980 4390,2980 4370,2960 4370,2290 4847.65,1812.35 U2.14 ; U1.27 4750.79,2883.41 4783.52,2916.14 4783.52,2956.23 v1(4780,2959.75)
  Bottom Layer w10: v1(4470,2970) 4630,2970 4680,2920 4740.25,2920 v1(4780,2959.75)
NetU1_28: U1.28 U3.3 | length 2915.5
  Top Layer w10: U3.3 3667.4,1242.6 3650,1260 3650,1720 3710,1780 3970,1780 4004.14,1814.14 4004.14,2214.14 4210,2420 4210,2940 4320,3050 v1(4480,3050) ; v1(4700,2959.75) 4731.1,2928.65 U1.28
  Bottom Layer w10: v1(4480,3050) 4609.75,3050 v1(4700,2959.75)
NetU1_29: U1.29 U7.13 | length 1
  Top Layer w10: U1.29@4710.71,2772.09 U1.29
NetU1_35: U1.35 U7.1 | length 1179.6
  Top Layer w10: U1.35 4466.73,2653.27 4434,2686 4434,2874 4660,3100 4803.54,3100 4904.15,3200.61 4904.15,3284.15 4954.97,3334.97 5031.14,3334.97 U7.1
NetU1_36: U1.36 U7.14
NetU1_39: U1.39 U7.9 | length 1.9
  Top Layer w10: U1.39@4572.31,2575.84 U1.39
NetU1_44: U1.44 U4.4 | length 2768.3
  Top Layer w10: v1(4470,2510) 4470,2505.84 4499.74,2476.1 U1.44 ; v1(4530,2780) 4530,2912.63 4664.62,3047.25 U4.4
  Bottom Layer w10: v1(4470,2510) 4530,2570 v1(4530,2780)
NetU1_45: U1.45 U4.1 | length 3185.8
  Top Layer w10: v1(4410,2510) 4410,2470 4423.58,2456.42 U1.45 ; v1(4470,2780) 4470,2877.37 4662.63,3070 6599.7,3070 6689.7,3160 6810,3160 6845,3125 U4.1
  Bottom Layer w10: v1(4410,2510) 4470,2570 v1(4470,2780)
NetU1_51: U1.51 U2.10 | length 1486.5
  Top Layer w10: v1(4680,2040) 4686.57,2040 4711.57,2015 5087.63,2015 5130.63,2058 5281.55,2058 5401,1938.55 5401,1871.45 5326.97,1797.42 5209.12,1797.42 U2.10 ; v1(4688.36,2157.46) 4690.87,2159.96 4690.87,2317.76 U1.51
  Bottom Layer w10: v1(4680,2040) 4685,2045 4685,2154.1 v1(4688.36,2157.46)
NetU1_53: U1.53 U2.11 | length 1248.5
  Top Layer w10: U1.53 4731.1,2243.38 4754.47,2220.01 4754.47,2140.89 4789.54,2105.82 v1(4789.54,2099.54) ; v1(4830,1979) 4831,1980 5080,1980 5142,2042 5244.77,2042 5266,2020.77 5266,1965.55 5057.88,1757.43 U2.11
  Bottom Layer w10: v1(4789.54,2099.54) 4800.37,2099.54 4830,2069.91 v1(4830,1979)
NetU1_55: U1.55 U7.4 | length 1959.5
  Top Layer w10: U1.55@4770.47,2318.15 4770.47,2169.53 4860.69,2079.31 5076.69,2079.31 5236,2238.63 5236,2316 v1(5380,2460) ; U7.4 5032.14,3217.86 v1(5140,3110)
  Bottom Layer w10: v1(5140,3110) 5140,2700 v1(5380,2460)
NetU1_56: U1.56 U7.12
NRST: R2.1 U1.7 X1.10 | length 1055.1
  Top Layer w10: U1.7 5380.47,2515.47 5420,2555 5420,2810 5500,2890 X1.10 5613.23,2943.23 5650,2980 R2.1
PP_Gate: D2.2 Q1.1 R11.2 | length 398.2
  Top Layer w10: Q1.1 6185.31,2848 6258,2848 v1(6260,2850) ; v1(6400,2850) 6462.01,2850 D2.2 R11.2
  Bottom Layer w10: v1(6260,2850) v1(6400,2850)
RT: R13.2 U5.4 | length 352.1
  Top Layer w10: R13.2 6640.98,3558.5 6729.49,3470 6847.37,3470 6860.31,3457.06 U5.4
SPLIT: C20.1 R7.1 R8.2 | length 393.5
  Top Layer w10: C20.1@6569.25,2817.76 6567.01,2820 6540,2820 6520,2800 6520,2640 6560,2600 R8.2
SWCLK: U1.49 X1.4 | length 1588.5
  Top Layer w10: U1.49 4652.36,2140.93 4689.34,2103.96 4689.58,2103.96 4733.54,2060 5080,2060 5445,2425 5445,2655 5530,2740 X1.4
SWDIO: R1.2 U1.46 X1.2 | length 2295.5
  Top Layer w10: U1.46 4526.73,2436.73 4500,2410 4500,2270.67 4682.71,2087.96 4682.95,2087.96 4730.91,2040 5087.37,2040 5470,2422.63 5470,2630 5530,2690 X1.2 5613.23,2636.77 5640,2610 5930,2610 5960,2640 R1.2
TR: C27.2 U5.7 | length 288.4
  Top Layer w10: U5.7 6860.31,3129.68 6950,3040 C27.2
VCAP_1: C8.1 U1.30 | length 908.1
  Top Layer w10: v1(4610,2914) 4610,2844.34 4615.86,2838.48 4661.52,2838.48 4690.73,2809.27 4690.73,2772.38 U1.30 ; v1(4650,3140) C8.1
  Bottom Layer w10: v1(4610,2914) 4604,2920 4450,2920 4390,2980 4390,3060 4420,3090 4610,3090 4650,3130 v1(4650,3140)
VCAP_2: C9.1 U1.62 | length 108.7
  Top Layer w10: U1.62 4908.39,2318.5 4908.39,2210.12 C9.1
pads on no net: U1.1 U1.2 U1.3 U1.5 U1.6 U1.8 U1.9 U1.10 U1.11 U1.14 U1.15 U1.16 U1.17 U1.20 U1.21 U1.22 U1.23 U1.24 U1.25 U1.33 U1.34 U1.37 U1.38 U1.40 U1.41 U1.42 U1.43 U1.50 U1.54 U1.58 U1.59 U1.61 U2.1 U2.2 U2.6 U2.16 U3.4 U5.5 U5.8 U7.2 U7.3 U7.10 X1.6 X1.7 X1.8 X1.9 X2.2 X2.3 X2.5 X2.6 X2.7 X2.8 X2.9 X2.10 X2.11 X2.12 X2.14 X2.15 X2.16 X2.18 X2.19 X2.20 X2.21 X2.22 X2.23 X2.24 X2.25 X2.26 X2.27

## Silkscreen, mask and mechanical layers (free items; w line width, h text height)
Top Overlay:
  text "HEART BEAT" at 5030,2090 h30

## Text inside footprints (layer, text, board x,y; h text height)
U4: Top Overlay "*" at 6880,3070 h30 r270; Mechanical 13 "*" at 6815.5,3016 h50 r270
U5: Top Overlay "*" at 6930,3400 h50 r270
U7: Top Overlay "*" at 4966.64,3351.45 h50; Mechanical 13 "*" at 5030.14,3320.82 h50